# Altium PCB ADM32F036QN56Q_BLDC_Demo_Rev1.0.PcbDoc (part 2 of 2)
Units mm, origin at the board's own origin, x right, y up, seen from the top; angles counter-clockwise.
Board outline 100.03 x 60.1 mm, 4 copper layers (Top Layer, S1, S2, Bottom Layer), stack 0.778 mm thick; 155 components, 87 nets, 444 pads, 417 vias.
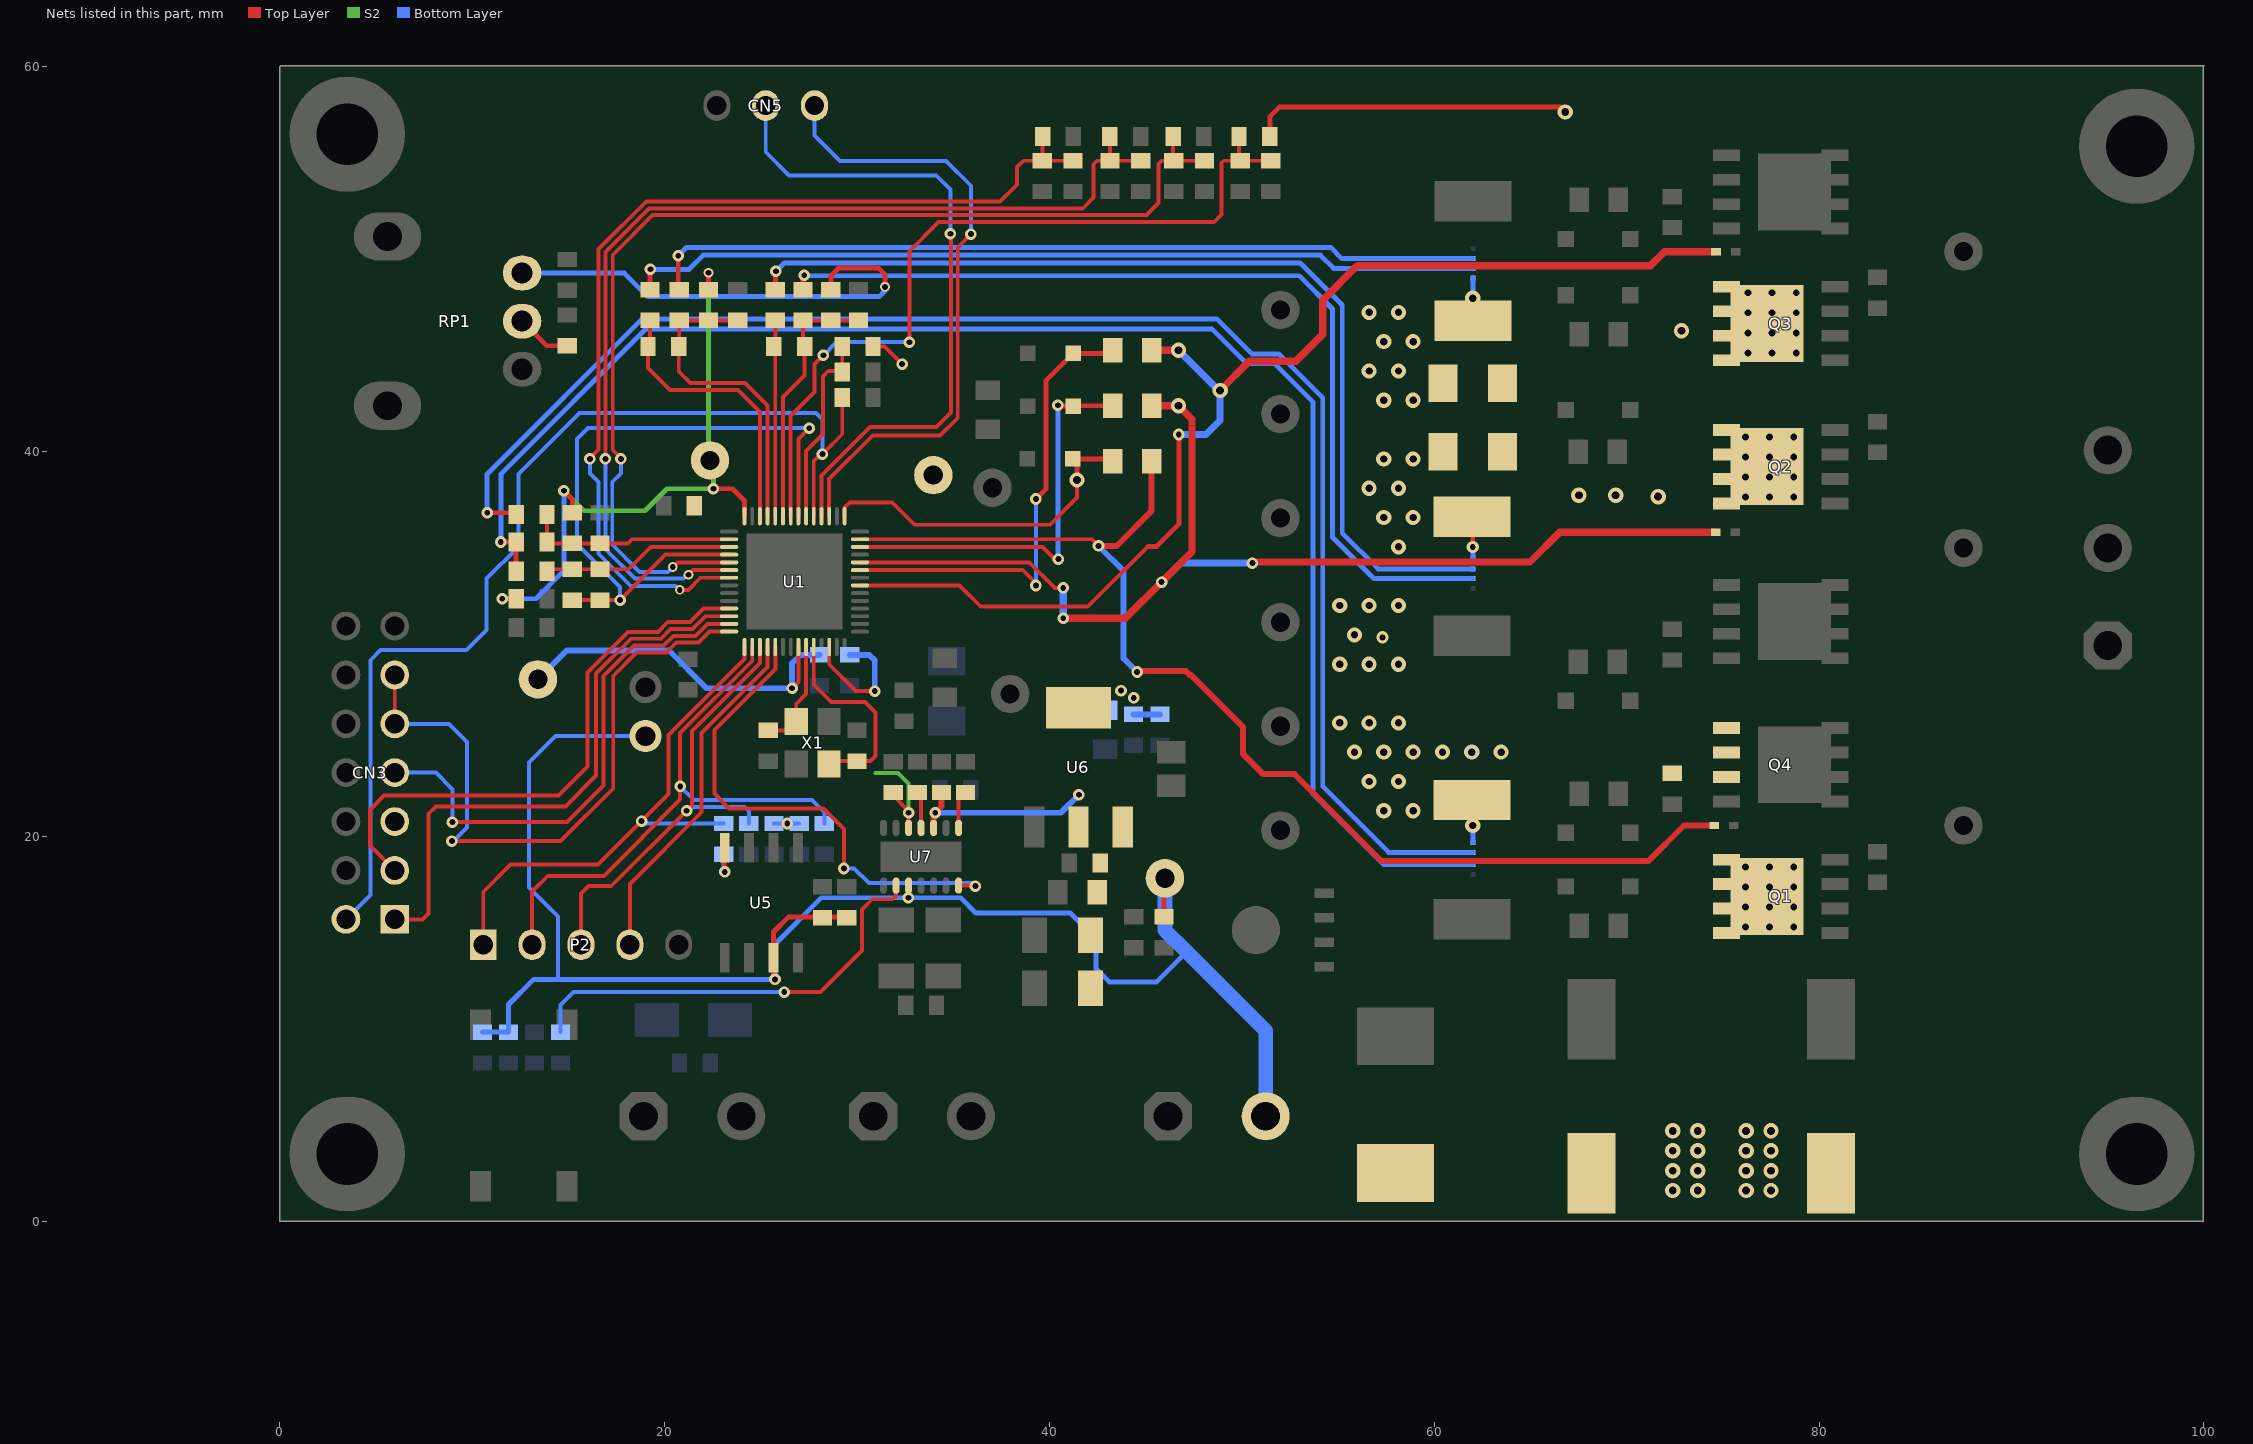
[diagram p4: the nets of this part, all layers, seen from the top]

## Via types
v1: diameter 0.6, hole 0.3, Top Layer to Bottom Layer, tented both sides, 135 vias
v2: diameter 0.787, hole 0.381, Top Layer to Bottom Layer, tented both sides, 130 vias
v3: diameter 0.66, hole 0.356, Top Layer to Bottom Layer, tented bottom, 72 vias
v4: diameter 0.8, hole 0.4, Top Layer to Bottom Layer, tented both sides, 66 vias
v5: diameter 0.5, hole 0.3, Top Layer to Bottom Layer, tented both sides, 5 vias
v6: diameter 0.635, hole 0.305, Top Layer to Bottom Layer, tented both sides, 4 vias
v7: diameter 0.787, hole 0.381, Top Layer to Bottom Layer, tented bottom, 4 vias
v8: diameter 1, hole 0.5, Top Layer to Bottom Layer, tented both sides, 1 vias

## Nets (pads, with @x,y where several pads share a name; then routed paths per layer and width w, separated by ;. In a path a pad name is that pad's centre, name@x,y a point inside that pad or via, vN(x,y) a via of type N, cw(c..) or ccw(c..) an arc to the next point about the centre after c; other vN are vias at no path point) (continued)
NetR54_1: R54.1 RP1.2 | length 2.9
  Top Layer w0.254: RP1.2@12.588,46.787 13.871,45.504 R54.1@14.935,45.504
NetR55_2: R55.2 U5.4 | length 2.2
  Top Layer w0.203: v1(23.114,18.161) U5.4@23.114,19.418
  Bottom Layer w0.203: R55.2@23.063,19.076 23.063,18.212 v1(23.114,18.161)
NetR64_2: R64.2 U7.9 | length 23
  Top Layer w0.203: v1(26.213,11.913) 28.092,11.913 30.251,14.072 30.251,16.205 30.785,16.739 31.852,16.739 32.025,16.912 U7.9@32.025,17.45
  Bottom Layer w0.203: R64.2@14.588,9.831 14.588,11.236 15.265,11.913 v1(26.213,11.913)
NetR71_2: R71.2 U7.1 | length 2
  Top Layer w0.203: U7.1@35.275,20.447 35.275,21.927 R71.2@35.636,22.289
NetR73_2: R73.2 U7.4 | length 1.9
  Top Layer w0.203: R73.2@33.13,22.289 33.325,22.094 U7.4@33.325,20.447
OP1N: R29.1 R30.2 R31.2 U1.3 | length 10
  Top Layer w0.2: R31.2@13.879,33.788 13.979,33.888 R29.1@15.193,33.888 R30.2@16.63,33.888 18.115,33.888 19.275,35.049 U1.3@23.346,35.049
OP1OUT: R29.2 R30.1 U1.4 U1.49 | length 35.5
  Top Layer w0.203: R29.2@15.193,32.288 R30.1@16.63,32.288 v1(17.678,32.288) 20.039,34.649 U1.4@23.346,34.649 ; U1.49@26.946,36.649 26.946,40.662 v1(27.508,41.224)
  Bottom Layer w0.203: v1(17.678,32.288) 17.678,32.969 15.443,35.204 15.443,40.665 16.002,41.224 v1(27.508,41.224)
OP1P: C5.2 R33.2 R34.2 R35.1 U1.2 | length 11
  Top Layer w0.203: R33.2@13.879,36.735 C5.2@13.879,35.312 13.956,35.235 R34.2@16.63,35.235 18.09,35.235 18.305,35.45 23.344,35.45 U1.2@23.346,35.449
PGA1N: C1.2 R21.1 U1.52 | length 10.2
  Top Layer w0.2: U1.52@25.746,36.649 25.746,45.391 C1.2@25.673,45.464 25.749,45.54 R21.1@25.749,46.825
PGA1P: C1.1 R10.2 R17.1 R18.1 U1.51 | length 13.6
  Top Layer w0.203: U1.51@26.146,36.649 26.146,42.834 27.273,43.961 C1.1@27.273,45.464 27.191,45.546 R18.1@27.191,46.825 R17.1@28.632,46.825 R10.2@30.074,46.825
PGA2N: C4.2 R27.1 U1.54 | length 14.7
  Top Layer w0.203: R27.1@19.228,46.825 19.228,45.564 C4.2@19.128,45.464 19.128,44.347 20.269,43.205 23.8,43.205 24.946,42.059 U1.54@24.946,36.649
PGA2P: C4.1 R24.2 R25.1 R26.1 U1.53 | length 16.8
  Top Layer w0.203: R24.2@23.8,46.825 R25.1@22.276,46.825 R26.1@20.752,46.825 20.752,45.488 C4.1@20.728,45.464 20.728,44.169 21.336,43.561 24.181,43.561 25.346,42.396 U1.53@25.346,36.649
R+: C2.2 C3.2 NT6.2 NT7.2 NT8.2 Q4.1 Q4.2 Q4.3 R14.1 RS1.1 RS2.1 RS3.2 | length 6.7
  Top Layer w0.254: RS3.2@61.944,21.896 61.995,21.845 v7(61.995,20.574) ; RS1.1@61.944,36.628 61.995,36.577 v6(61.995,35.052) ; v7(61.995,47.981) 61.995,46.816 RS2.1@62,46.811
  Bottom Layer w0.254: v7(61.995,20.574) 62,20.569 NT8.2@62,19.685 ; v6(61.995,35.052) 62.001,35.045 NT6.2@62.001,34.417 ; v7(61.995,47.981) 62,47.986 NT7.2@62,49.022
  other v2: 57.372,21.336 58.896,21.336 56.61,22.86 58.134,22.86 55.848,24.384 57.372,24.384 58.896,24.384 60.42,24.384 61.944,24.384 63.468,24.384 55.086,25.908 56.61,25.908 58.134,25.908 55.086,28.956 56.61,28.956 58.134,28.956 55.848,30.48 55.086,32.004 56.61,32.004 58.134,32.004 58.134,35.052 57.372,36.576 58.896,36.576 56.61,38.1 58.134,38.1 57.372,39.624 58.896,39.624 57.372,42.672 58.896,42.672 56.61,44.196 58.134,44.196 57.372,45.72 58.896,45.72 56.61,47.244 58.134,47.244
  other v6: 57.302,30.353
SCIRXD: CN5.1 U1.45 | length 33
  Top Layer w0.203: U1.45@28.546,36.649 28.546,38.579 30.81,40.843 34.315,40.843 35.23,41.758 35.23,50.622 v1(35.916,51.308)
  Bottom Layer w0.203: CN5.1@27.788,57.988 27.788,56.439 29.108,55.118 34.62,55.118 35.916,53.823 v1(35.916,51.308)
SCITXD: CN5.2 U1.46 | length 34.6
  Top Layer w0.203: U1.46@28.146,36.649 28.146,38.763 30.675,41.292 34.129,41.292 34.874,42.037 34.874,51.308 v1(34.849,51.333)
  Bottom Layer w0.203: CN5.2@25.248,57.988 25.248,55.575 26.467,54.356 34.112,54.356 34.849,53.619 v1(34.849,51.333)
SCLK_LINTXA: P2.1 R55.1 U1.15 | length 28.1
  Top Layer w0.203: P2.1@10.566,14.376 10.566,17.12 11.989,18.542 16.535,18.542 v1(18.796,20.803) 20.198,22.204 20.198,25.278 24.146,29.226 U1.15@24.146,29.849
  Bottom Layer w0.203: v1(18.796,20.803) 18.923,20.803 19.05,20.676 R55.1@23.063,20.676
SN_RS: C5.1 NT9.1 R31.1 | length 83
  Top Layer w0.254: v1(11.481,35.306) 12.272,35.306 C5.1@12.279,35.312 R31.1@12.279,33.788
  Bottom Layer w0.254: v1(11.481,35.306) 11.481,38.837 19.025,46.38 48.438,46.38 50.241,44.577 51.701,44.577 53.689,42.589 53.689,22.225 57.372,18.542 NT9.1@62,18.542
SNV: NT6.1 R21.2 | length 50.9
  Top Layer w0.254: R21.2@25.749,48.425 25.749,49.346 v1(25.781,49.378)
  Bottom Layer w0.254: v1(25.781,49.378) 26.213,49.809 53.029,49.809 55.213,47.625 55.213,35.77 57.074,33.909 NT6.1@62.001,33.909
SNW: NT7.1 R27.2 | length 44.4
  Top Layer w0.254: R27.2@19.228,48.425 19.228,49.454 v1(19.253,49.479)
  Bottom Layer w0.254: v1(19.253,49.479) 21.26,49.479 21.996,50.216 54.077,50.216 54.762,49.53 NT7.1@62,49.53
SP_RS: NT8.1 R33.1 | length 81.4
  Top Layer w0.254: v1(10.77,36.83) 12.183,36.83 R33.1@12.279,36.735
  Bottom Layer w0.254: v1(10.77,36.83) 10.77,38.844 18.814,46.888 48.711,46.888 50.514,45.085 51.911,45.085 54.197,42.799 54.197,22.606 57.626,19.177 NT8.1@62,19.177
SPI_SIMO: P2.4 U1.18 | length 18.4
  Top Layer w0.203: P2.4@18.186,14.376 18.186,17.526 21.92,21.26 21.92,25.376 25.346,28.802 U1.18@25.346,29.849
SPI_SOMI/SLP: P2.3 R53.2 U1.17 | length 24.1
  Top Layer w0.203: P2.3@15.646,14.376 15.646,17.043 16.027,17.424 17.221,17.424 v1(21.133,21.336) 21.407,21.611 21.407,25.482 24.946,29.02 U1.17@24.946,29.849
  Bottom Layer w0.203: v1(21.133,21.336) 21.336,21.539 24.155,21.539 24.371,21.323 R53.2@24.371,20.676
SPV: NT4.1 R18.2 | length 49.1
  Top Layer w0.254: v1(27.254,49.166) 27.191,49.103 R18.2@27.191,48.425 R18.2@27.28,48.514
  Bottom Layer w0.254: v1(27.254,49.166) 27.276,49.145 52.975,49.145 54.705,47.415 54.705,35.56 56.864,33.401 NT4.1@62.001,33.401
SPW: NT5.1 R26.2 | length 43.5
  Top Layer w0.254: v1(20.701,50.19) 20.701,48.476 R26.2@20.752,48.425
  Bottom Layer w0.254: v1(20.701,50.19) 21.133,50.622 54.61,50.622 55.194,50.038 NT5.1@62,50.038
STB: U1.19 U7.14 | length 26.6
  Top Layer w0.203: U1.19@25.746,29.849 25.746,28.699 22.581,25.534 22.581,22.225 23.343,21.463 28.245,21.463 29.312,20.396 v1(29.312,18.339) ; U7.14@35.275,17.45 36.119,17.45 v1(36.144,17.424)
  Bottom Layer w0.203: v1(29.312,18.339) 29.845,18.339 30.607,17.577 35.992,17.577 v1(36.144,17.424)
STE_LINRXA: P2.2 R52.1 U1.16 | length 30.6
  Top Layer w0.203: P2.2@13.106,14.376 13.106,17.145 13.919,17.958 16.84,17.958 20.803,21.92 v1(20.803,22.606) 20.803,25.38 24.546,29.123 U1.16@24.546,29.849
  Bottom Layer w0.203: v1(20.803,22.606) 21.514,21.895 27.661,21.895 28.296,21.26 R52.1@28.296,20.676
TCK: CN3.9 CN3.11 U1.14 | length 34.7
  Top Layer w0.203: CN3.9@5.969,25.857 CN3.11@5.969,28.397 ; v1@8.814,19.634 v1(8.941,19.761) 14.58,19.761 17.323,22.504 17.323,28.346 18.542,29.566 20.091,29.566 20.599,30.074 21.747,30.074 22.322,30.649 U1.14@23.346,30.649
  Bottom Layer w0.203: CN3.9@5.969,25.857 8.788,25.857 9.728,24.917 9.728,20.472 9.017,19.761 v1(8.941,19.761)
TDI: CN3.3 U1.11 | length 29.6
  Top Layer w0.203: CN3.3@5.969,18.237 4.674,19.533 4.674,21.387 5.41,22.123 14.47,22.123 15.977,23.63 15.977,28.524 18.085,30.632 19.65,30.632 20.158,31.14 21.305,31.14 22.014,31.849 U1.11@23.346,31.849
TDO: CN3.7 U1.13 | length 27
  Top Layer w0.203: v1(8.966,20.752) 14.91,20.752 16.815,22.657 16.815,28.341 18.395,29.921 19.944,29.921 20.452,30.429 21.6,30.429 22.219,31.049 U1.13@23.346,31.049
  Bottom Layer w0.203: CN3.7@5.969,23.317 8.103,23.317 8.966,22.454 v1(8.966,20.752)
TMS: CN3.1 U1.12 | length 30
  Top Layer w0.203: CN3.1@5.969,15.697 7.417,15.697 7.722,16.002 7.722,21.184 8.103,21.565 14.834,21.565 16.434,23.165 16.434,28.463 18.247,30.277 19.797,30.277 20.305,30.785 21.453,30.785 22.117,31.449 U1.12@23.346,31.449
TRSTn: CN3.2 R60.2 U1.47 | length 55.6
  Top Layer w0.203: U1.47@27.746,36.649 27.746,39.506 28.118,39.878 v1(28.194,39.878) 29.225,40.909 R60.2@29.225,42.878
  Bottom Layer w0.203: CN3.2@3.429,15.697 4.699,16.967 4.699,29.159 5.232,29.693 9.703,29.693 10.744,30.734 10.744,33.401 12.395,35.052 12.395,38.837 15.57,42.012 27.864,42.012 28.194,41.681 v1(28.194,39.878) v1@27.999,39.878
U: C12.1 NT1.1 U1.41 | length 61.7
  Top Layer w0.203: U1.41@30.146,35.449 42.199,35.449 v1(42.545,35.103)
  Top Layer w0.305: v1(42.545,35.103) 43.485,35.103 45.307,36.925 C12.1@45.307,39.497 ; v1(44.552,28.55) 44.598,28.596 47.084,28.596 47.277,28.402 47.341,28.402 50.063,25.679 50.063,24.282 51.105,23.241 52.73,23.241 57.252,18.72 71.12,18.72 72.974,20.574 NT1.1@74.549,20.574
  Bottom Layer w0.305: v1(42.545,35.103) 43.84,33.807 43.84,29.261 v1(44.552,28.55)
V: C13.1 NT2.1 U1.38 | length 60
  Top Layer w0.203: U1.38@30.146,34.249 38.946,34.249 40.276,32.918 v1(40.716,32.918)
  Top Layer w0.381: v1(40.716,31.344) 40.724,31.336 43.934,31.336 v1(45.822,33.223) 47.404,34.806 47.404,41.686 v4(46.704,42.386) C13.1@45.307,42.386 ; v1(50.546,34.214) 50.597,34.265 64.973,34.265 66.523,35.814 NT2.1@74.625,35.814 NT2.1@74.651,35.814
  Bottom Layer w0.381: v1(40.716,31.344) v1(40.716,32.918) ; v1(45.822,33.223) 46.812,34.214 v1(50.546,34.214)
VBU: C12.2 D8.K U1.43 | length 17.9
  Top Layer w0.203: U1.43@29.346,36.649 29.346,37.093 29.616,37.363 31.826,37.363 32.985,36.204 40.014,36.204 41.427,37.617 v4(41.427,38.532)
  Top Layer w0.254: v4(41.427,38.532) 41.427,39.407 D8.K@41.21,39.624 43.148,39.624 C12.2@43.275,39.497
VBV: C13.2 D9.K U1.40 | length 21.8
  Top Layer w0.203: U1.40@30.146,35.049 39.627,35.049 40.259,34.417 v1(40.462,34.417)
  Top Layer w0.254: v1(40.437,42.418) 40.488,42.367 D9.K@41.224,42.367 41.243,42.386 C13.2@43.275,42.386
  Bottom Layer w0.254: v1(40.437,42.418) 40.437,34.239 40.462,34.265 v1(40.462,34.417)
VBW: C15.2 D11.K U1.37 | length 24.5
  Top Layer w0.203: U1.37@30.146,33.849 38.608,33.849 39.294,33.163 v1(39.294,33.045)
  Top Layer w0.254: v1(39.294,37.541) 39.807,38.054 39.807,43.693 D11.K@41.224,45.11 43.11,45.11 C15.2@43.275,45.276
  Bottom Layer w0.203: v1(39.294,33.045) v1(39.294,37.541)
VDD: C36.2 TP7.1 U1.22 | length 19.8
  Top Layer w0.203: v1(26.619,27.711) 26.946,28.038 U1.22@26.946,29.849
  Bottom Layer w0.3: TP7.1@13.411,28.169 14.91,29.667 20.218,29.667 22.174,27.711 v1(26.619,27.711) 26.619,29.007 27.049,29.437 C36.2@28.042,29.437
VDD5V: C41.1 C42.1 C45.2 R4.1 U6.2 U7.3 | length 11.3
  Top Layer w0.305: U7.3@33.975,20.447 33.975,21.148 v1(34.061,21.234) 34.383,21.556 C45.2@34.383,22.289
  Bottom Layer w0.305: v1(34.061,21.234) 40.589,21.234 v1(41.529,22.174) ; C41.1@44.36,26.345 R4.1@45.745,26.345
  other v1: 44.374,27.203 43.713,27.584
VDDA: C37.1 R17.2 R25.2 R35.2 R38.2 RP1.3 TP15.1 U1.56 | length 59
  Top Layer w0.254: v1(11.557,32.36) R38.2@12.279,32.36 ; v1(14.757,37.973) 15.193,37.537 R35.2@15.193,36.835 ; R25.2@22.276,48.425 v5(22.276,49.301) ; v1(22.53,38.075) 23.52,38.075 24.146,37.449 U1.56@24.146,36.649 ; R17.2@28.632,48.425 28.632,49.13 29.058,49.555 31.09,49.555 31.445,49.2 v5(31.445,48.565)
  S2 w0.254: v1(14.757,37.973) 15.799,36.932 18.974,36.932 20.117,38.075 v1(22.53,38.075) 22.53,39.37 TP15.1@22.352,39.548 ; TP15.1@22.276,39.548 v5(22.276,49.301)
  Bottom Layer w0.254: v1(11.557,32.36) 13.31,32.36 14.757,33.807 v1(14.757,37.973) ; RP1.3@12.588,49.287 12.594,49.281 17.902,49.281 19.126,48.057 22.276,48.057 ; v5(22.276,49.301) 22.276,48.057 ; v5(31.445,48.565) 31.445,48.362 31.14,48.057 22.276,48.057
VDDIO: C34.1 C46.2 CN3.5 R49.1 R51.1 R62.1 TP14.1 U1.26 U7.5 | length 15.7
  Top Layer w0.2: U1.26@28.546,29.849 28.546,28.954 29.941,27.559 v1(30.912,27.559) ; R62.1@30.825,45.464 31.422,45.464 v1(32.334,44.552)
  Top Layer w0.203: C46.2@31.877,22.289 31.877,22.134 32.675,21.336 v1(32.675,21.241) U7.5@32.675,20.447
  S2 w0.203: 30.963,23.292 32.131,23.292 32.675,22.748 v1(32.675,21.241)
  Bottom Layer w0.203: R49.1@25.679,20.676 R51.1@26.987,20.676
  Bottom Layer w0.3: C34.1@29.616,29.437 30.634,29.437 30.912,29.159 v1(30.912,27.559)
  other v1: 26.365,20.676
VM: C2.1 C3.1 C25.1 C26.1 C43.1 C44.1 C49.2 CN1.2 D4.2 E1.1 E2.1 JP1.2 Q1.5 Q1.6 Q1.7 Q1.8 Q1.9 Q2.5 Q2.6 Q2.7 Q2.8 Q2.9 Q3.5 Q3.6 Q3.7 Q3.8 Q3.9 R5.1 R47.2 R48.2 R50.1 R63.2 TP1.1 U5.7 U6.3 U7.10 | length 105.3
  Top Layer w0.254: v1(25.73,12.573) 25.654,12.649 U5.7@25.654,13.703 25.654,15.037 26.429,15.812 28.296,15.812 C25.1@29.566,15.812 ; v1(32.664,16.815) 32.664,17.439 U7.10@32.675,17.45 ; R5.1@45.949,15.824 45.949,17.78 TP1.1@45.999,17.831 ; R50.1@51.448,56.382 51.448,57.417 51.943,57.912 66.548,57.912 v4(66.802,57.658) ; Q3.6@75.302,47.244 Q3.9@76.284,46.262
  Bottom Layer w0.203: 14.453,12.573 14.453,15.85 12.954,17.348 12.954,23.851 14.326,25.222 JP1.2@18.999,25.222
  Bottom Layer w0.254: C49.2@10.524,9.831 R63.2@11.879,9.831 11.879,11.269 13.183,12.573 14.453,12.573 v1(25.73,12.573) 25.73,14.402 28.143,16.815 v1(32.664,16.815) 35.382,16.815 36.17,16.027 41.072,16.027 42.418,14.681 42.418,13.132 43.104,12.446 45.568,12.446 47.13,14.008
  Bottom Layer w0.762: TP1.1@45.999,17.831 45.999,15.138 47.13,14.008 51.232,9.906 CN1.2@51.232,5.486
  other v3: 76.168,15.291 77.425,15.291 78.683,15.291 76.168,16.332 77.425,16.332 78.683,16.332 76.168,17.374 77.425,17.374 78.683,17.374 76.168,18.415 77.425,18.415 78.683,18.415 76.168,37.643 77.425,37.643 78.683,37.643 76.168,38.684 77.425,38.684 78.683,38.684 76.168,39.726 77.425,39.726 78.683,39.726 76.168,40.767 77.425,40.767 78.683,40.767 76.295,45.136 77.552,45.136 78.81,45.136 76.295,46.177 77.552,46.177 78.81,46.177 76.295,47.219 77.552,47.219 78.81,47.219 76.295,48.26 77.552,48.26 78.81,48.26
  other v4: 72.39,1.6 73.685,1.6 76.2,1.6 77.495,1.6 72.39,2.633 73.685,2.633 76.2,2.633 77.495,2.633 72.39,3.666 73.685,3.666 76.2,3.666 77.495,3.666 72.39,4.699 73.685,4.699 76.2,4.699 77.495,4.699 71.628,37.668 67.513,37.744 69.418,37.744 72.847,46.279
VSENU: C14.2 R19.2 R23.1 U1.7 | length 52.4
  Top Layer w0.203: v1(16.113,39.624) 16.113,39.676 16.561,40.124 16.561,50.526 19.039,53.005 37.435,53.005 38.303,53.873 38.303,54.788 38.64,55.124 R23.1@39.626,55.124 ; v5(20.777,32.817) 21.234,32.817 21.866,33.449 U1.7@23.346,33.449 ; R19.2@39.639,56.382 39.639,55.137 R23.1@39.626,55.124 ; C14.2@41.221,55.124 R23.1@39.626,55.124
  Bottom Layer w0.203: v1(16.113,39.624) 16.113,38.878 16.561,38.43 16.561,34.696 18.232,33.025 20.569,33.025 v5(20.777,32.817)
VSENV: C19.2 R32.2 R39.1 U1.6 | length 54.8
  Top Layer w0.203: v1(16.916,39.624) 16.916,50.379 19.187,52.649 41.727,52.649 42.291,53.213 42.291,54.94 42.475,55.124 R39.1@43.144,55.124 ; v5(21.234,33.604) 21.479,33.849 U1.6@23.346,33.849 ; R32.2@43.134,56.382 43.134,55.135 R39.1@43.144,55.124 ; C19.2@44.739,55.124 R39.1@43.144,55.124
  Bottom Layer w0.203: v1(16.916,39.624) 16.916,34.93 18.446,33.401 20.98,33.401 21.184,33.604 v5(21.234,33.604)
VSENVM: C30.2 R50.2 R58.1 U1.50 | length 42.1
  Top Layer w0.203: U1.50@26.546,36.649 26.546,41.862 27.788,43.104 27.788,44.552 v1(28.245,45.009) ; v1(32.715,45.695) 32.715,50.419 34.234,51.938 48.56,51.938 48.946,52.324 48.946,55.016 49.054,55.124 49.79,55.124 C30.2@49.848,55.182 ; R50.2@49.848,56.382 C30.2@49.848,55.182 ; R58.1@51.5,55.124 C30.2@49.905,55.124 C30.2@49.848,55.182
  Bottom Layer w0.203: v1(28.245,45.009) 28.931,45.695 v1(32.715,45.695)
VSENW: C22.2 R45.2 R46.1 U1.5 | length 57.5
  Top Layer w0.203: v1(17.72,39.624) 17.72,39.676 17.297,40.098 17.297,50.221 19.37,52.294 45.029,52.294 45.669,52.934 45.669,54.966 45.828,55.124 R46.1@46.455,55.124 ; v5(20.422,34.011) 20.66,34.249 U1.5@23.346,34.249 ; R45.2@46.421,56.382 46.421,55.158 R46.1@46.455,55.124 ; C22.2@48.05,55.124 R46.1@46.455,55.124
  Bottom Layer w0.203: v1(17.72,39.624) 17.72,38.878 17.272,38.43 17.272,35.179 18.694,33.757 20.168,33.757 v5(20.422,34.011)
W: C15.1 NT3.1 U1.35 | length 61.7
  Top Layer w0.203: U1.35@30.146,33.049 35.328,33.049 36.424,31.953 41.986,31.953 45.11,35.077
  Top Layer w0.254: 45.11,35.077 45.568,35.077 46.736,36.246 46.736,40.869 v1(46.711,40.894)
  Top Layer w0.381: C15.1@45.307,45.276 v4(46.704,45.276) ; v4(48.863,43.18) 50.387,44.704 52.8,44.704 54.197,46.101 54.197,47.879 55.975,49.657 71.215,49.657 71.958,50.4 NT3.1@74.644,50.4
  Bottom Layer w0.381: v4(46.704,45.276) 48.8,43.18 v4(48.863,43.18) 48.863,41.624 48.133,40.894 v1(46.711,40.894)
X1: C39.2 U1.24 X1.3 | length 10.6
  Top Layer w0.203: U1.24@27.746,29.849 27.746,27.905 28.656,26.995 30.409,26.995 30.963,26.441 30.963,24.181 30.696,23.914 C39.2@29.997,23.914 28.684,23.914 X1.3@28.536,23.767
X2: C38.2 U1.23 X1.1 | length 5.7
  Top Layer w0.203: C38.2@25.375,25.514 26.384,25.514 X1.1@26.836,25.967 26.836,26.887 27.346,27.397 U1.23@27.346,29.849
XRS: C47.2 R62.2 U1.48 | length 10.1
  Top Layer w0.203: U1.48@27.346,36.649 27.346,40.046 28.219,40.919 28.219,43.917 28.497,44.194 29.225,44.194 R62.2@29.225,45.51
pads on no net: CN3.6 CN3.13 CN3.14 RP1.0 U1.10 U5.8 U7.8 U7.11

## Polygon pours and split planes (outlines as drawn)
GND on S2 "i" (solid, remove dead copper, pour order 152): 100,51.613 92.745,51.613 91.135,53.222 91.135,56.801 89.745,58.191 56.261,58.191 55.448,57.379 55.448,52.73 51.943,49.225 38.735,49.225 36.22,46.711 36.22,33.223 34.976,31.979 32.69,31.979 32.41,31.699 32.41,-0.025 99.975,-0.025 100,0 100,51.562 99.974,51.587
VM on S2 "Top Layer-VDD3V3" (solid, remove dead copper, pour order 150): 49.022,0 49.022,6.858 50.165,8.001 54.851,8.001 55.994,6.858 85.217,6.858 85.852,6.223 85.852,0
VM on S2 "Top Layer-VDD3V3" (solid, pour order 148): 76.073,58.166 76.073,50.038 76.708,49.403 78.994,49.403 79.502,48.895 79.502,36.83 76.327,36.83 75.946,36.449 75.946,20.193 76.835,19.304 78.994,19.304 79.248,19.05 79.248,-0.127 79.121,0 70.866,0 70.866,12.573 65.659,17.78 65.659,58.166
VDDIO on S2 "i" (solid, remove dead copper, pour order 86): 98.266,32.131 98.291,32.106 100.051,32.106 100.076,32.131 100.076,60.02 100.025,60.071 0.102,60.071 0.102,0.102 0.203,0 29.896,0 29.947,0.051 31.557,0.051 31.557,31.303 32.563,32.309 34.9,32.309 35.916,33.325 35.916,46.761 38.659,49.505 51.765,49.505 55.118,52.857 55.118,57.531 56.109,58.522 89.992,58.522 91.491,57.023 91.491,53.365 94.107,50.749 95.428,50.749 98.577,47.6 98.577,32.512 98.603,32.487
R+ on S2 "i" (solid, remove dead copper, pour order 68): 56.185,48.336 55.27,47.422 55.27,44.602 53.67,43.002 53.67,25.095 55.245,23.52 55.245,21.666 56.794,20.117 64.846,20.117 64.846,26.772 64.745,26.873 58.953,26.873 58.953,33.198 59.715,33.96 64.872,33.96 64.821,34.011 64.821,48.336
NetNT4_2 on S2 "i" (solid, remove dead copper, pour order 60): 64.846,33.452 59.563,33.452 59.309,33.198 59.309,27.483 64.389,27.483 64.846,27.94
NetNT5_2 on S2 "i" (solid, remove dead copper, pour order 54): 64.795,58.191 56.261,58.191 55.448,57.379 55.448,51.714 55.55,51.613 64.795,51.613 64.821,51.587
MOTU on S2 "i" (solid, remove dead copper, pour order 44): 79.724,14.224 99.873,14.224 100,14.351 100,31.674 91.459,31.674 90.5,30.715 90.5,28.854 87.833,26.187 76.549,26.187 76.549,20.32 76.93,19.939 79.724,19.939
MOTV on S2 "i" (solid, remove dead copper, pour order 38): 79.978,43.053 91.916,43.053 93.44,41.529 93.44,38.227 98.266,38.227 98.266,32.131 91.161,32.131 90.068,31.039 90.068,29.083 87.655,26.67 76.549,26.67 76.549,36.195 79.978,36.195
MOTW on S2 "i" (solid, remove dead copper, pour order 32): 76.549,50.218 76.549,58.191 89.745,58.191 91.147,56.79 91.147,53.211 93.964,50.394 95.225,50.394 95.225,50.371 98.259,47.337 98.259,38.608 93.694,38.608 93.694,41.656 91.916,43.434 79.978,43.434 79.978,50.184 76.577,50.19
GND on S1 "i" (solid, remove dead copper, pour order 146): 100,51.613 92.745,51.613 91.135,53.222 91.135,56.801 89.745,58.191 56.261,58.191 55.448,57.379 55.448,52.73 51.943,49.225 38.735,49.225 36.22,46.711 36.22,33.223 34.976,31.979 32.69,31.979 29.845,29.134 29.845,0 29.87,-0.025 99.975,-0.025 100,0 100,51.562 99.974,51.587
VM on S1 "Top Layer-VDD3V3" (solid, pour order 136): 76.073,58.166 76.073,50.038 76.708,49.403 78.994,49.403 79.502,48.895 79.502,36.83 76.327,36.83 75.946,36.449 75.946,20.193 76.835,19.304 78.994,19.304 79.248,19.05 79.248,-0.127 79.121,0 70.866,0 70.866,12.573 65.659,17.78 65.659,58.166
GND on S1 "i" (solid, remove dead copper, pour order 80): 98.266,32.131 98.291,32.106 100.051,32.106 100.076,32.131 100.076,60.02 100.025,60.071 0.102,60.071 0.102,0.102 0.203,0 29.896,0 29.947,0.051 30.429,0.051 30.373,0.107 30.373,11.228 30.196,11.405 29.489,11.405 29.515,11.43 29.515,29.261 32.563,32.309 34.9,32.309 35.916,33.325 35.916,46.761 38.659,49.505 51.765,49.505 55.118,52.857 55.118,57.531 56.109,58.522 89.992,58.522 91.491,57.023 91.491,53.365 94.107,50.749 95.428,50.749 98.577,47.6 98.577,32.512 98.603,32.487
NetCN1_1 on S1 "Top Layer-VDD3V3" (solid, pour order 138): 49.047,-0.025 49.047,7.645 49.911,8.509 60.071,8.509 60.071,11.049 59.436,11.684 53.848,11.684 53.213,12.319 53.213,17.297 52.603,17.907 48.514,17.907 47.879,17.272 47.879,12.446 46.863,11.43 44.414,11.43 43.434,10.45 43.434,0 49.022,0
VM on S1 "Top Layer-VDD3V3" (solid, pour order 134): 49.022,0 49.022,6.858 50.165,8.001 54.851,8.001 55.994,6.858 85.217,6.858 85.852,6.223 85.852,0
R+ on S1 "i" (solid, remove dead copper, pour order 66): 56.185,48.336 55.27,47.422 55.27,44.602 53.67,43.002 53.67,25.095 55.245,23.52 55.245,21.666 56.794,20.117 64.846,20.117 64.846,26.772 64.745,26.873 58.953,26.873 58.953,33.198 59.715,33.96 64.872,33.96 64.821,34.011 64.821,48.336
NetNT4_2 on S1 "i" (solid, remove dead copper, pour order 58): 64.846,33.452 59.563,33.452 59.309,33.198 59.309,27.483 64.389,27.483 64.846,27.94
NetNT5_2 on S1 "i" (solid, remove dead copper, pour order 52): 64.795,58.191 56.261,58.191 55.448,57.379 55.448,51.714 55.55,51.613 64.795,51.613 64.821,51.587
MOTU on S1 "i" (solid, remove dead copper, pour order 42): 79.724,14.224 99.873,14.224 100,14.351 100,31.674 91.459,31.674 90.5,30.715 90.5,28.854 87.833,26.187 76.549,26.187 76.549,20.32 76.93,19.939 79.724,19.939
MOTV on S1 "i" (solid, remove dead copper, pour order 36): 79.978,43.053 91.916,43.053 93.44,41.529 93.44,38.227 98.266,38.227 98.266,32.131 91.161,32.131 90.068,31.039 90.068,29.083 87.655,26.67 76.549,26.67 76.549,36.195 79.978,36.195
MOTW on S1 "i" (solid, remove dead copper, pour order 30): 76.549,50.218 76.549,58.191 89.745,58.191 91.147,56.79 91.147,53.211 93.964,50.394 95.225,50.394 95.225,50.371 98.259,47.337 98.259,38.608 93.694,38.608 93.694,41.656 91.916,43.434 79.978,43.434 79.978,50.184 76.577,50.19
GND on Bottom Layer "i" (solid, remove dead copper, pour order 188): 100,51.613 92.745,51.613 91.135,53.222 91.135,56.801 89.745,58.191 56.261,58.191 55.448,57.379 55.448,52.73 51.943,49.225 38.735,49.225 36.22,46.711 36.22,33.223 34.976,31.979 33.401,31.979 29.845,28.423 29.845,0 29.87,-0.025 99.975,-0.025 100,0 100,51.562 99.974,51.587
GND on Bottom Layer "i" (solid, remove dead copper, pour order 186): 98.266,32.131 98.291,32.106 100.051,32.106 100.076,32.131 100.076,60.02 100.025,60.071 0.102,60.071 0.102,0.102 0.203,0 29.896,0 29.947,0.051 30.429,0.051 30.373,0.107 30.373,11.228 30.196,11.405 29.489,11.405 29.515,11.43 29.515,29.261 32.563,32.309 34.9,32.309 35.916,33.325 35.916,46.761 38.659,49.505 51.765,49.505 55.118,52.857 55.118,57.531 56.109,58.522 89.992,58.522 91.491,57.023 91.491,53.365 94.107,50.749 95.428,50.749 98.577,47.6 98.577,32.512 98.603,32.487
R+ on Bottom Layer "i" (solid, remove dead copper, pour order 70): 56.185,48.336 55.27,47.422 55.27,44.602 53.67,43.002 53.67,25.095 54.483,24.282 54.483,22.428 56.794,20.117 64.846,20.117 64.846,26.772 64.745,26.873 58.953,26.873 58.953,33.198 59.715,33.96 64.872,33.96 64.821,34.011 64.821,48.336
NetNT4_2 on Bottom Layer "i" (solid, remove dead copper, pour order 62): 64.872,33.426 64.897,33.401 64.897,27.915 64.465,27.483 59.309,27.483 59.309,33.122 59.385,33.198 61.62,33.198 61.824,33.401 64.846,33.401
NetNT5_2 on Bottom Layer "i" (solid, remove dead copper, pour order 56): 64.795,58.191 56.261,58.191 55.448,57.379 55.448,51.714 55.55,51.613 64.795,51.613 64.821,51.587
MOTU on Bottom Layer "i" (solid, remove dead copper, pour order 40): 79.724,14.224 99.873,14.224 100,14.351 100,31.674 91.459,31.674 90.5,30.715 90.5,28.854 87.833,26.187 76.549,26.187 76.549,20.32 76.93,19.939 79.724,19.939
MOTV on Bottom Layer "i" (solid, remove dead copper, pour order 34): 79.978,43.053 91.916,43.053 93.44,41.529 93.44,38.227 98.266,38.227 98.266,32.131 91.161,32.131 90.068,31.039 90.068,29.083 87.655,26.67 76.549,26.67 76.549,36.195 79.978,36.195
MOTW on Bottom Layer "i" (solid, remove dead copper, pour order 28): 76.549,50.218 76.549,58.191 89.745,58.191 91.147,56.79 91.147,53.211 93.964,50.394 95.225,50.394 95.225,50.371 98.259,47.337 98.259,38.608 93.694,38.608 93.694,41.656 91.916,43.434 79.978,43.434 79.978,50.184 76.577,50.19
VDD5V on Bottom Layer "Top Layer-VDD3V3" (solid, pour order 166): 39.522,25.756 45.085,25.756 45.288,25.959 45.288,27.178 44.603,27.863 39.854,27.863 39.827,27.889 39.395,27.457 39.395,25.883
GND on Top Layer "GND_L01_P182" (solid, remove dead copper, pour order 182): 100,51.613 92.745,51.613 91.135,53.222 91.135,56.801 89.745,58.191 56.261,58.191 55.448,57.379 55.448,52.73 51.943,49.225 38.735,49.225 36.22,46.711 36.22,33.223 34.976,31.979 32.69,31.979 29.845,29.134 29.845,0 29.87,-0.025 99.975,-0.025 100,0 100,51.562 99.974,51.587
GND on Top Layer "i" (solid, remove dead copper, pour order 176): 98.266,32.131 98.291,32.106 100.051,32.106 100.076,32.131 100.076,60.02 100.025,60.071 0.102,60.071 0.102,0.102 0.203,0 29.896,0 29.947,0.051 30.429,0.051 30.373,0.107 30.373,11.228 30.196,11.405 29.489,11.405 29.515,11.43 29.515,29.261 32.563,32.309 34.9,32.309 35.916,33.325 35.916,46.761 38.659,49.505 51.765,49.505 55.118,52.857 55.118,57.531 56.109,58.522 89.992,58.522 91.491,57.023 91.491,53.365 94.107,50.749 95.428,50.749 98.577,47.6 98.577,32.512 98.603,32.487
GND on Top Layer "Top Layer-VDD3V3" (solid, pour order 170): 32.41,30.658 32.766,30.302 34.519,30.302 34.849,29.972 34.849,28.423 35.56,27.711 37.084,27.711 37.287,27.915 37.287,29.464 36.424,29.464 34.265,31.623 32.41,31.623
LDO_IN on Top Layer "Top Layer-VDD3V3" (solid, pour order 168): 30.489,30.649 30.489,29.506 30.81,29.185 30.836,29.21 32.283,29.21 33.071,28.423 34.29,28.423 34.29,29.439 34.315,29.464 34.188,29.591 32.944,29.591 32.512,30.023 31.598,30.023 30.972,30.649
NetCN1_1 on Top Layer "Top Layer-VDD3V3" (solid, pour order 128): 48.641,0 48.641,7.239 49.911,8.509 60.071,8.509 60.071,11.049 59.436,11.684 53.848,11.684 53.213,12.319 53.213,17.12 52.781,17.551 48.311,17.551 47.879,17.12 47.879,12.446 46.863,11.43 44.414,11.43 43.434,10.45 43.434,0
R+ on Top Layer "i" (solid, remove dead copper, pour order 64): 66.98,45.517 66.98,48.082 66.243,48.819 56.28,48.819 53.594,46.133 53.594,24.606 55.042,23.158 55.042,21.38 56.864,19.558 64.865,19.558 65.779,20.472 66.65,20.472 66.65,22.53 67.031,22.911 70.002,22.911 70.028,22.885 73.025,22.885 73.304,22.606 76.149,22.606 76.175,22.581 76.175,28.753 76.098,28.677 69.875,28.677 69.647,28.448 69.723,28.372 69.723,26.695 70.155,26.264 59.157,26.264 59.131,26.289 59.131,34.798 59.106,34.823 64.567,34.823 64.618,34.773 64.618,38.075 64.77,38.227 61.468,38.227 61.417,38.278 61.417,45.339 66.777,45.339 66.929,45.491
VM on Top Layer "Top Layer-VDD3V3" (solid, pour order 130): 49.403,0 49.403,6.731 50.673,8.001 54.851,8.001 55.994,6.858 85.217,6.858 85.852,6.223 85.852,0
VDD5V on Top Layer "Top Overlay-No Net" (solid, remove dead copper, pour order 124): 24.155,23.876 29.515,23.912 29.515,21.819 24.155,21.819
MOTV on Top Layer "i" (solid, remove dead copper, pour order 2): 79.978,43.053 91.916,43.053 93.44,41.529 93.44,38.227 98.266,38.227 98.266,32.131 91.161,32.131 90.068,31.039 90.068,29.083 87.655,26.67 76.549,26.67 76.549,36.195 79.978,36.195
MOTU on Top Layer "i" (solid, remove dead copper, pour order 4): 79.724,14.224 99.873,14.224 100,14.351 100,31.674 91.459,31.674 90.5,30.715 90.5,28.854 87.833,26.187 76.549,26.187 76.549,20.32 76.93,19.939 79.724,19.939
NetNT5_2 on Top Layer "i" (solid, remove dead copper, pour order 12): 76.2,52.451 76.2,57.277 75.413,58.064 55.474,58.064 55.474,51.689 66.294,51.689 67.056,52.451 67.056,53.721 70.104,53.721 70.104,52.451
VM on Top Layer "i" (solid, remove dead copper, pour order 14): 79.629,49.403 79.629,36.576 64.897,36.576 64.77,36.449 64.77,38.227 62.484,38.227 62.357,38.354 62.357,45.085 70.104,45.085 70.866,45.847 70.866,48.133 71.247,48.133 72.39,49.276 79.375,49.276 79.502,49.403
NetNT4_2 on Top Layer "i" (solid, remove dead copper, pour order 16): 76.073,35.56 66.954,35.56 65.176,33.782 59.309,33.782 59.309,27.051 66.825,27.051 67.484,27.71 67.484,29.638 67.691,29.845 76.073,29.845
MOTW on Top Layer "i" (solid, remove dead copper, pour order 26): 76.549,50.218 76.549,58.54 89.469,58.54 89.469,58.467 91.147,56.79 91.147,53.211 93.964,50.394 95.225,50.394 95.225,50.371 98.259,47.337 98.259,38.608 93.694,38.608 93.694,41.656 91.916,43.434 79.978,43.434 79.978,50.184 79.985,50.19 76.577,50.19
VM on Top Layer "Top Layer-VDD3V3" (solid, pour order 142): 71.501,16.891 73.787,19.177 79.1,19.177 79.336,18.941 79.336,13.804 79.248,13.716 72.009,13.716 71.501,14.224
VDD5V on Top Layer "Top Layer-VDD3V3" (solid, pour order 164): 40.716,22.708 39.395,24.028 39.395,27.457 39.827,27.889 44.577,27.889 45.288,27.178 45.288,25.222 44.094,24.028 42.367,22.301 42.367,19.355 40.742,19.355 40.716,19.38
VDDA on Top Layer "Top Layer-VDD3V3" (solid, pour order 172): 21.057,40.941 23.601,40.941 24.333,40.208 24.333,36.22 23.149,36.22 22.692,36.678 21.057,36.678
VM on Top Layer "Top Layer-VDD3V3" (solid, pour order 180): 41.097,15.418 41.961,16.281 41.961,18.974 42.24,19.253 42.799,19.253 43.231,19.685 43.231,21.463 43.536,21.768 44.755,21.768 47.491,19.032 47.491,17.272 47.059,16.84 43.51,16.84 43.256,16.586 43.256,11.125 41.097,11.125

## Keep-outs
Keep-Out Layer:
  the board outline again, w0.1

## Other copper
Top Layer:
  pour cut-out: 37.433,45.974 37.494,46.035 45.561,45.974 45.561,45.429 45.561,38.227 37.588,38.227
  pour cut-out: 86.233,0 99.949,0 99.909,0.04 99.909,13.836 86.233,13.836
  text "Advchip" at 86.868,10.795 h2.4
Bottom Layer:
  pour cut-out: 29.693,27.051 29.743,27.102 31.166,27.102 31.166,28.57 31.272,28.677 31.106,28.842 29.845,28.842 29.693,28.69

## Silkscreen, mask and mechanical layers (free items; w line width, h text height)
Top Overlay:
  circle w0.3: c95.6,22.318 r2.5
  lines w0.1: 28.931,13.36 30.988,11.303 31.801,11.303 ; 11.506,30.353 11.506,37.643 11.836,37.973 13.589,37.973 14.199,38.583 14.199,43.713 14.554,44.069 18.517,44.069 20.015,42.57 20.015,38.354 17.577,35.916 17.577,31.267 15.85,29.54 12.319,29.54 11.506,30.353
  lines w0.254: -10,0 2,0 ; -10,60 2,60 ; -4.508,1.524 -4,0 ; -4.508,58.476 -4,60 ; -4,24.95 -4,0 ; -4,35.05 -4,60 ; -3.492,1.524 -4,0 ; -3.492,58.476 -4,60 ; -0.099,-8.267 -0.099,-0.267 ; 1.425,-4.775 -0.099,-4.267 ; 1.425,-3.759 -0.099,-4.267 ; 3.255,38.576 cw(c5.055,38.6) 3.5,37.693 ; 3.5,36.937 3.5,37.693 ; 4.167,37.693 3.5,37.693 ; 44.253,-4.267 -0.099,-4.267 ; 55.55,-4.267 99.901,-4.267 ; 98.377,-4.775 99.901,-4.267 ; 98.377,-3.759 99.901,-4.267 ; 99.901,-8.267 99.901,-0.267
  text "ADM32F036Q_BLDC_Demo" at 56.109,57.048 h2
  text "GND" at 21.641,54.966 h1
  text "TX" at 24.765,54.966 h1
  text "RX" at 27.153,54.966 h1
  text "1" at 88.011,46.101 h2.5
  text "0-3V" at 7.264,40.437 h1 r270
  text "+" at 4.318,39.362 h1.8 r270
  text "JTAG" at 10.211,26.01 h1.52 r270
  text "60 (mm)" at -2.687,25.204 h1.52 r90
  text "LDO_EN" at 15.265,22.174 h1
  text "Pb" at 93.923,21.133 h2.54
  text "CLK" at 11.074,15.977 h1 r90
  text "STE" at 13.621,15.977 h1 r90
  text "SOMI" at 16.167,15.977 h1 r90
  text "SIMO" at 18.713,15.977 h1 r90
  text "GND" at 21.26,15.977 h1 r90
  text "25/1/7" at 89.052,15.215 h1.5
  text "SPI" at 9.677,11.76 h1
  text "H" at 36.627,10.998 h1.5
  text "L" at 28.956,10.973 h1.5
  text "GND" at 16.891,10.953 h1.5
  text "LIN" at 22.733,10.953 h1.5
  text "GND" at 44.374,10.795 h1.5
  text "VM" at 50.317,10.795 h1.5
  text "WAKE_UP" at 8.865,3.023 h1 r90
  text "100 (mm)" at 44.507,-5.58 h1.52
Bottom Overlay:
  circle w0.2: c70.587,39.167 r1.25
  text "www.advancechip.com" at 65.43,53.753 h1.52 r90
  text "Contact:0731-88731029" at 68.377,53.753 h1.52 r90
  text "Powered by" at 71.171,53.753 h1.52 r90
  text "C" at 71.349,39.758 h1.52 r90
  text "Advancechip Co.,LTD" at 71.247,37.472 h1.52 r90
  text "N" at 40.996,10.236 h3
Top Solder:
  rectangle: 86.328,9.525 99.568,13.589
Drill Drawing:
  text ".Legend" at 81.407,-10.414 h5.08